# Altium PCB Zotino.PCBDOC (part 6 of 10)
Units mm, origin at the board's own origin, x right, y up, seen from the top; angles counter-clockwise.
Board outline 160.1 x 100.1 mm, 4 copper layers (TopLayer, Internal Plane 2, Signal Layer 1, BottomLayer), stack 1.563 mm thick; 759 components, 378 nets, 2272 pads, 779 vias.
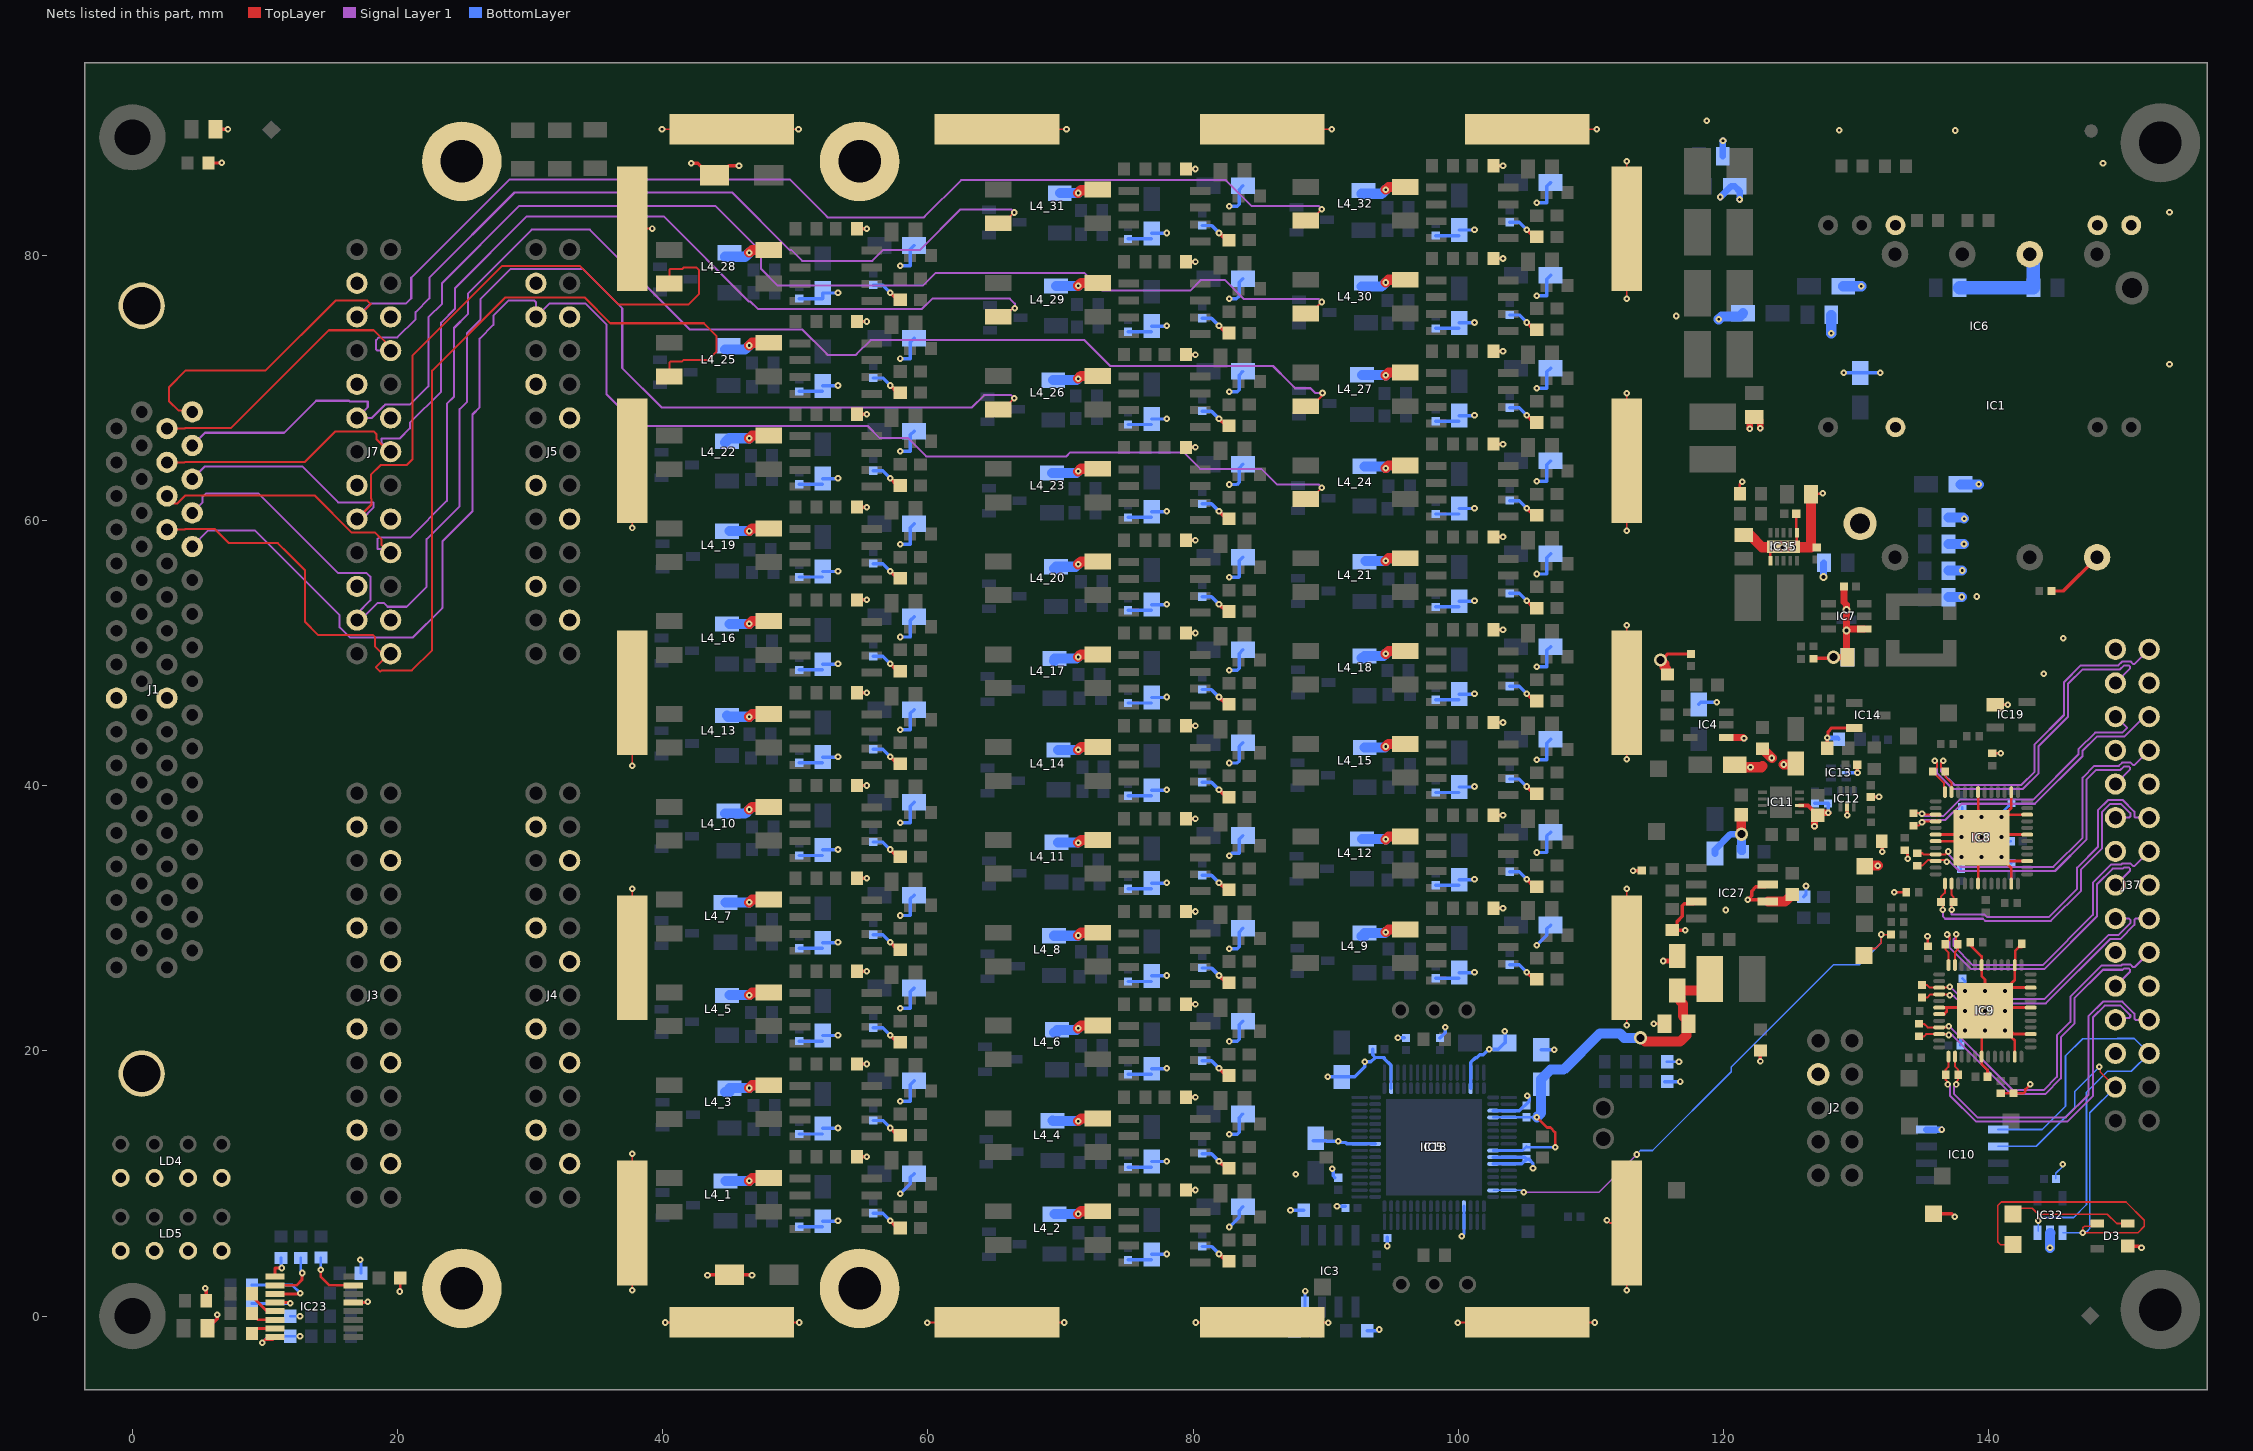
[diagram p6: the nets of this part, all layers, seen from the top]

## Via types
v1: diameter 0.5, hole 0.2, TopLayer to BottomLayer, tented both sides, 659 vias
v2: diameter 0.6, hole 0.3, TopLayer to BottomLayer, tented both sides, 56 vias
v3: diameter 1, hole 0.6, TopLayer to BottomLayer, tented both sides, 26 vias
v4: diameter 0.6, hole 0.3, TopLayer to BottomLayer, 18 vias
v5: diameter 1, hole 0.5, TopLayer to BottomLayer, tented both sides, 9 vias
v6: diameter 0.5, hole 0.2, TopLayer to BottomLayer, tented bottom, 7 vias
v7: diameter 0.5, hole 0.2, TopLayer to BottomLayer, 4 vias

## Nets (pads, with @x,y where several pads share a name; then routed paths per layer and width w, separated by ;. In a path a pad name is that pad's centre, name@x,y a point inside that pad or via, vN(x,y) a via of type N, cw(c..) or ccw(c..) an arc to the next point about the centre after c; other vN are vias at no path point) (continued)
DAC_OUT_P24: J1.26 J5.22 L4_24.4 | length 123
  TopLayer w0.152: L4_24.4@88.49,61.619 88.83,61.619 v1(89.695,62.485)
  Signal Layer 1 w0.152: J1.26@4.514,58.039 5.73,59.255 9.242,59.255 15.628,52.868 15.628,51.953 16.395,51.186 21.162,51.186 23.3,53.325 23.389,53.414 23.389,58.431 25.65,60.692 25.65,67.995 26.183,68.528 26.183,73.723 27.225,74.764 27.225,75.461 28.351,76.586 30.324,76.586 30.436,76.473 J5.22@30.436,75.354 31.44,76.358 34.176,76.358 35.771,74.763 35.771,69.506 38.147,67.129 55.452,67.129 56.34,66.241 58.467,66.241 59.864,64.843 70.449,64.843 70.744,65.139 79.286,65.139 80.522,63.904 85.135,63.904 86.331,62.707 89.473,62.707 v1(89.695,62.485)
DAC_OUT_P25: J1.27 J7.1 L4_25.4 | length 82.2
  TopLayer w0.152: J1.27@2.609,59.309 3.934,59.309 3.972,59.347 6.231,59.347 7.288,58.29 10.969,58.29 11.782,57.477 13.02,56.239 13.02,52.352 13.991,51.381 18.131,51.381 18.309,51.203 18.309,50.492 18.847,49.954 J7.1@19.476,49.954 19.362,49.954 18.359,48.951 18.704,48.606 18.794,48.695 21.082,48.695 22.606,50.219 22.606,71.301 28.14,76.835 34.096,76.835 36.052,74.878 43.097,74.878 44.044,73.931 44.044,72.72 43.415,72.09 42.426,72.09 42.42,72.096 41.547,72.096 41.437,71.987 40.579,71.987 40.49,71.897 L4_25.4@40.49,70.869
DAC_OUT_P26: J1.28 J7.4 L4_26.4 | length 100.7
  TopLayer w0.152: L4_26.4@65.29,68.369 65.63,68.369 v1(66.495,69.235)
  Signal Layer 1 w0.152: J1.28@4.514,60.579 5.305,61.37 5.305,61.795 5.559,62.049 9.496,62.049 15.515,56.03 16.513,56.03 ; 16.521,56.038 17.666,56.038 17.94,55.764 17.94,53.984 16.936,52.981 J7.4@16.936,52.494 17.2,52.494 18.469,53.763 18.988,53.763 19.254,53.498 20.679,53.498 22.196,55.014 22.196,58.602 24.685,61.092 24.685,68.395 25.218,68.928 25.218,74.123 26.26,75.164 26.26,76.718 28.53,78.988 33.959,78.988 36.944,76.003 36.944,71.501 39.918,68.526 63.302,68.526 64.233,69.457 66.273,69.457 v1(66.495,69.235)
DAC_OUT_P27: J1.29 J7.7 L4_27.4 | length 118.3
  TopLayer w0.152: J1.29@2.609,61.849 3.171,61.287 3.372,61.287 3.972,61.887 13.745,61.887 16.521,59.111 18.275,59.111 18.778,58.608 18.778,58.177 19.381,57.574 J7.7@19.476,57.574 ; L4_27.4@88.49,68.619 88.939,68.619 89.757,69.437 v1(89.757,69.619)
  Signal Layer 1 w0.152: J7.7@19.476,57.574 19.192,57.858 18.473,57.858 18.473,58.608 18.581,58.716 20.944,58.716 23.72,61.491 23.72,68.794 24.253,69.328 24.253,74.523 25.294,75.564 25.294,77.118 30.11,81.933 34.499,81.933 41.948,74.484 42.038,74.394 50.536,74.394 52.362,72.568 52.452,72.478 54.545,72.478 54.635,72.568 55.673,73.606 71.806,73.606 73.759,71.653 86.02,71.653 87.24,70.434 87.697,69.977 88.849,69.977 89.207,69.619 v1(89.757,69.619)
DAC_OUT_P28: J1.30 J7.10 L4_28.4 | length 63.7
  TopLayer w0.152: J7.10@16.936,60.114 18.034,61.212 18.034,61.621 17.983,61.672 17.983,63.448 18.726,64.191 20.681,64.191 21.132,64.642 21.132,72.452 27.882,79.202 33.745,79.202 36.671,76.276 41.91,76.276 42.744,77.11 42.744,78.862 42.516,79.09 41.591,79.09 41.488,78.987 40.579,78.987 40.49,78.897 L4_28.4@40.49,77.869
  Signal Layer 1 w0.152: J1.30@4.514,63.119 5.476,64.081 12.798,64.081 15.515,61.364 15.533,61.346 17.478,61.346 17.495,61.364 18.194,61.364 18.194,60.988 17.32,60.114 J7.10@16.936,60.114
DAC_OUT_P29: J1.31 J7.13 L4_29.4 | length 84.1
  TopLayer w0.152: J1.31@2.609,64.389 3.934,64.389 3.972,64.427 13.017,64.427 15.32,66.731 18.199,66.731 18.411,66.519 18.411,66.121 19.338,65.194 J7.13@19.476,65.194 ; L4_29.4@65.29,75.369 65.74,75.369 66.393,76.022 v1(66.548,76.022)
  Signal Layer 1 w0.152: J7.13@19.476,65.194 18.783,65.888 18.783,66.151 18.821,66.19 20.163,66.19 20.926,66.952 20.926,67.365 23.288,69.728 23.288,74.922 24.329,75.964 24.329,77.517 29.745,82.933 40.068,82.933 46.482,76.519 46.608,76.519 47.169,75.958 59.549,75.958 60.324,76.733 66.176,76.733 66.548,76.361 v1(66.548,76.022)
DAC_OUT_P30: J1.32 J7.16 L4_30.4 | length 106.4
  TopLayer w0.152: L4_30.4@88.49,75.619 88.83,75.619 v1(89.695,76.485)
  Signal Layer 1 w0.152: J1.32@4.514,65.659 5.476,66.621 11.451,66.621 13.864,69.034 16.327,69.034 16.395,68.966 17.751,68.966 17.751,68.549 J7.16@16.936,67.734 18.058,67.734 18.926,68.603 19.061,68.738 20.933,68.738 22.323,70.127 22.323,75.322 23.364,76.364 23.364,77.917 29.185,83.738 43.944,83.738 47.423,80.259 47.423,78.968 48.682,77.709 59.596,77.709 60.573,78.686 71.802,78.686 73.146,77.343 79.781,77.343 80.594,78.156 82.373,78.156 83.822,76.707 89.473,76.707 v1(89.695,76.485)
DAC_OUT_P31: J1.33 J7.19 L4_31.4 | length 81.9
  TopLayer w0.152: J1.33@2.609,66.929 3.934,66.929 3.972,66.967 7.429,66.967 14.812,74.351 18.199,74.351 19.476,73.074 J7.19@19.476,72.814 ; L4_31.4@65.29,82.369 65.63,82.369 v1(66.495,83.235)
  Signal Layer 1 w0.152: J7.19@19.476,72.814 18.47,72.814 18.386,72.899 18.386,73.606 18.589,73.81 19.985,73.81 21.357,75.182 21.357,75.722 22.399,76.763 22.399,78.317 28.82,84.738 45.227,84.738 49.551,80.414 49.678,80.414 50.513,79.578 55.807,79.578 56.642,80.414 59.406,80.414 62.449,83.457 66.273,83.457 v1(66.495,83.235)
DAC_OUT_P32: J1.34 J7.22 L4_32.4 | length 105.4
  TopLayer w0.152: J1.34@4.514,68.199 4.426,68.288 3.485,68.288 2.761,69.012 2.761,70.05 4.031,71.32 10.054,71.32 15.32,76.586 17.72,76.586 17.98,76.326 17.009,75.354 J7.22@16.936,75.354 ; L4_32.4@88.49,82.619 88.83,82.619 v1(89.695,83.485)
  Signal Layer 1 w0.152: J7.22@16.936,75.354 17.94,76.358 20.628,76.358 21.031,76.76 21.031,78.314 28.455,85.738 49.561,85.738 52.362,82.936 52.452,82.847 59.68,82.847 59.77,82.936 62.507,85.674 82.468,85.674 84.435,83.707 89.473,83.707 v1(89.695,83.485)
DVCC: C7.1 C8.2 C13.2 C14.1 C83.2 IC5.52 IC5.57 IC18.52 IC18.57 L1.2 | length 33.7
  TopLayer w0.203: v1(105.919,14.988) 106.682,14.226 106.939,14.226 107.302,13.863 v6(107.302,12.738)
  TopLayer w0.762: v3(113.744,20.988) 113.808,20.988 114.087,20.71 116.731,20.71 117.2,21.179 117.2,22.069 117.344,22.213 116.93,22.627 116.93,23.547 116.748,23.729 116.748,24.31 C7.1@116.504,24.554 118.341,24.554 118.96,25.173 L1.2@118.96,25.423
  BottomLayer w0.203: IC18.57@102.626,12.488 IC5.57@103.801,12.488 104.844,12.488 C83.2@105.144,12.788 ; IC18.52@102.626,14.988 IC5.52@103.801,14.988 v1(105.919,14.988) ; C83.2@105.144,12.738 v6(107.302,12.738)
  BottomLayer w0.762: v1(105.919,14.988) 106.244,15.313 C14.1@106.244,17.488 106.244,17.888 106.944,18.588 107.944,18.588 110.681,21.326 112.174,21.326 112.511,20.988 v3(113.744,20.988)
GND: C1.1 C2.1 C3.1 C4.1 C5.1 C7.2 C8.1 C9.1 C10.2 C11.2 C12.2 C13.1 C14.2 C15.2 C17.1 C18.1 C19.1 C20.1 C21.1 C22.1 C23.1 C24.1 C25.1 C26.1 C28.1 C29.1 C30.1 C31.1 C32.1 C33.1 C34.1 C35.1 C36.1 C37.1 C38.1 C47.2 C50.1 C53.1 C61_1.1 C61_2.1 C61_3.1 C61_4.1 C61_5.1 C61_6.1 C61_7.1 C61_8.1 C61_9.1 C61_10.1 C61_11.1 C61_12.1 C61_13.1 C61_14.1 C61_15.1 C61_16.1 C61_17.1 C61_18.1 C61_19.1 C61_20.1 C61_21.1 C61_22.1 C61_23.1 C61_24.1 C61_25.1 C61_26.1 C61_27.1 C61_28.1 C61_29.1 C61_30.1 C61_31.1 C61_32.1 C62_1.1 C62_2.1 C62_3.1 C62_4.1 C62_5.1 C62_6.1 C62_7.1 C62_8.1 C62_9.1 C62_10.1 C62_11.1 C62_12.1 C62_13.1 C62_14.1 C62_15.1 C62_16.1 C62_17.1 C62_18.1 C62_19.1 C62_20.1 C62_21.1 C62_22.1 C62_23.1 C62_24.1 C62_25.1 C62_26.1 C62_27.1 C62_28.1 C62_29.1 C62_30.1 C62_31.1 C62_32.1 C63.1 C68.1 C69.1 C70.1 C71.1 C76.1 C77.1 C78.1 C79.2 C80.1 C81.1 C82.1 C83.1 C90_1.2 C90_2.2 C90_3.2 C90_4.2 C90_5.2 C90_6.2 C90_7.2 C90_8.2 C90_9.2 C90_10.2 C90_11.2 C90_12.2 C90_13.2 C90_14.2 C90_15.2 C90_16.2 C90_17.2 C90_18.2 C90_19.2 C90_20.2 C90_21.2 C90_22.2 C90_23.2 C90_24.2 C90_25.2 C90_26.2 C90_27.2 C90_28.2 C90_29.2 C90_30.2 C90_31.2 C90_32.2 C91_1.1 C91_2.1 C91_3.1 C91_4.1 C91_5.1 C91_6.1 C91_7.1 C91_8.1 C91_9.1 C91_10.1 C91_11.1 C91_12.1 C91_13.1 C91_14.1 C91_15.1 C91_16.1 C91_17.1 C91_18.1 C91_19.1 C91_20.1 C91_21.1 C91_22.1 C91_23.1 C91_24.1 C91_25.1 C91_26.1 C91_27.1 C91_28.1 C91_29.1 C91_30.1 C91_31.1 C91_32.1 C92_1.1 C92_2.1 C92_3.1 C92_4.1 C92_5.1 C92_6.1 C92_7.1 C92_8.1 C92_9.1 C92_10.1 C92_11.1 C92_12.1 C92_13.1 C92_14.1 C92_15.1 C92_16.1 C92_17.1 C92_18.1 C92_19.1 C92_20.1 C92_21.1 C92_22.1 C92_23.1 C92_24.1 C92_25.1 C92_26.1 C92_27.1 C92_28.1 C92_29.1 C92_30.1 C92_31.1 C92_32.1 C93_1.1 C93_2.1 C93_3.1 C93_4.1 C93_5.1 C93_6.1 C93_7.1 C93_8.1 C93_9.1 C93_10.1 C93_11.1 C93_12.1 C93_13.1 C93_14.1 C93_15.1 C93_16.1 C93_17.1 C93_18.1 C93_19.1 C93_20.1 C93_21.1 C93_22.1 C93_23.1 C93_24.1 C93_25.1 C93_26.1 C93_27.1 C93_28.1 C93_29.1 C93_30.1 C93_31.1 C93_32.1 C95.1 C96.1 C124.2 C129.1 C130.1 C131.1 C132.2 C133.1 C134.2 C136.2 C137.1 C138.1 C139.1 C140.1 C141.1 C142.1 C144.1 C147.1 C148.1 C149.1 C150.1 C151.1 CLIP28.1 CLIP29.1 CLIP30.1 CLIP31.1 CLIP32.1 CLIP33.1 CLIP34.1 CLIP37.1 CLIP38.1 CLIP39.1 CLIP40.1 CLIP41.1 CLIP42.1 CLIP43.1 CLIP44.1 CLIP45.1 CLIP46.1 CLIP47.1 D1.2 D2.1 D3.1 IC1.3 IC1.5 IC1.8 IC3.4 IC4.1 IC5.4 IC5.25 IC5.34 IC5.46 IC5.51 IC5.58 IC5.59 IC6.2 IC6.3 IC6.9 IC6.16 IC7.1 IC8.6 IC8.7 IC8.18 IC8.23 IC8.27 IC8.31 IC8.34 IC8.38 IC8.43 IC8.49 IC9.6 IC9.7 IC9.18 IC9.23 IC9.27 IC9.31 IC9.34 IC9.38 IC9.43 IC9.49 IC10.4 IC11.6 IC12.2 IC13.2 IC14.2 IC18.4 IC18.25 IC18.34 IC18.46 IC18.51 IC18.58 IC18.59 IC19.1 IC23.8 IC23.13 IC27.3 IC27.6 IC27.7 IC32.2 IC35.1 IC35.6 IC35.11 J1.17 J1.51 J1.69 J1.70 J2.3 J3.3 J3.6 J3.9 J3.12 J3.15 J3.18 J3.21 J3.24 J4.3 J4.6 J4.9 J4.12 J4.15 J4.18 J4.21 J4.24 J5.3 J5.6 J5.9 J5.12 J5.15 J5.18 J5.21 J5.24 J7.3 J7.6 J7.9 J7.12 J7.15 J7.18 J7.21 J7.24 J37.1 J37.4 J37.7 J37.10 J37.13 J37.16 J37.19 J37.22 J37.25 L4_1.2 L4_2.2 L4_3.2 L4_4.2 L4_5.2 L4_6.2 L4_7.2 L4_8.2 L4_9.2 L4_10.2 L4_11.2 L4_12.2 L4_13.2 L4_14.2 L4_15.2 L4_16.2 L4_17.2 L4_18.2 L4_19.2 L4_20.2 L4_21.2 L4_22.2 L4_23.2 L4_24.2 L4_25.2 L4_26.2 L4_27.2 L4_28.2 L4_29.2 L4_30.2 L4_31.2 L4_32.2 LD4.1 LD4.3 LD4.5 LD4.7 LD5.1 LD5.3 LD5.5 LD5.7 pad.0@54.844,2.088 pad.1 pad.2 pad.3 R2.1 R15.1 R16.1 R17.1 R19.1 R20.1 R21.1 R23.1 R28.1 R29.1 R34.1 R40.1 R44.1 R68_1.1 R68_2.1 R68_3.1 R68_4.1 R68_5.1 R68_6.1 R68_7.1 R68_8.1 R68_9.1 R68_10.1 R68_11.1 R68_12.1 R68_13.1 R68_14.1 R68_15.1 R68_16.1 R68_17.1 R68_18.1 R68_19.1 R68_20.1 R68_21.1 R68_22.1 R68_23.1 R68_24.1 R68_25.1 R68_26.1 R68_27.1 R68_28.1 R68_29.1 R68_30.1 R68_31.1 R68_32.1 R70.1 R153.1 R157.2 R164.1 R171.2 TP6.1 TP7.1 | length 765.9
  TopLayer w0.127: CLIP38.1@37.425,81.738 CLIP38.1@37.707,82.019 v1(39.208,82.019) ; v1(37.694,12.238) 37.707,12.226 CLIP46.1@37.707,7.019 37.707,2.166 v1(37.707,1.942) ; v1(37.694,41.517) 37.694,41.947 37.707,41.96 CLIP40.1@37.707,47.019 ; CLIP47.1@37.707,27.019 v1(37.707,32.226) ; v1(37.707,59.442) 37.707,59.666 CLIP39.1@37.707,64.519 ; v1(39.944,89.519) CLIP41.1@45.206,89.519 v1(50.231,89.519) ; v1(40.194,-0.481) CLIP43.1@45.206,-0.481 50.06,-0.481 v1(50.284,-0.481) ; v1(59.944,-0.512) 59.975,-0.481 CLIP44.1@65.206,-0.481 70.06,-0.481 v1(70.284,-0.481) ; CLIP42.1@65.206,89.519 v1(70.444,89.519) ; v1(80.194,-0.481) CLIP32.1@85.206,-0.481 90.163,-0.481 v1(90.194,-0.512) ; CLIP33.1@85.206,89.519 v1(90.444,89.519) ; v1(99.944,-0.512) 99.975,-0.481 CLIP45.1@105.206,-0.481 110.06,-0.481 v1(110.283,-0.481) ; CLIP34.1@105.206,89.519 v1(110.444,89.519) ; v1(111.207,7.238) 111.425,7.019 CLIP37.1@112.707,7.019 112.707,2.166 v1(112.707,1.942) ; v1(112.694,41.988) 112.707,42.001 CLIP29.1@112.707,47.019 112.707,51.873 v1(112.707,52.096) ; v1(112.694,76.738) 112.707,76.751 CLIP31.1@112.707,82.019 112.707,86.873 v1(112.707,87.096) ; v1(112.707,21.942) 112.707,22.166 CLIP28.1@112.707,27.019 v1(112.707,32.238) ; v1(112.707,59.238) CLIP30.1@112.707,64.519 112.707,69.373 v1(112.707,69.596)
  TopLayer w0.203: v1(9.785,-2.011) 9.785,-1.977 10,-1.762 10.575,-1.762 IC23.8@10.757,-1.581 ; IC23.13@16.657,1.019 17.681,1.019 v1(17.751,1.089) ; v1(20.164,1.851) 20.202,1.889 C96.1@20.202,2.867 ; v1(114.744,22.038) C8.1@115.544,22.038 ; R164.1@121.232,62.019 121.232,62.736 v1(121.419,62.924) ; IC35.6@123.531,56.969 123.531,57.848 IC35.11@123.542,57.858 ; IC35.11@125.447,57.985 125.531,58.07 IC35.1@125.531,59.069 ; C150.1@125.482,60.519 125.482,59.347 IC35.1@125.574,59.255 ; C151.1@126.432,61.668 126.432,62.019 127.449,62.019 v1(127.479,62.049) ; v1(132.888,31.973) R19.1@133.781,31.973 ; R17.1@133.673,35.135 133.693,35.135 133.882,34.946 133.882,34.501 v1(133.888,34.494) ; v1(135.386,28.648) 135.411,28.623 R20.1@135.411,27.899 ; IC8.7@136,35.819 137.781,35.819 138.031,36.069 IC8.49@139.45,36.069 ; IC8.6@136,36.319 IC8.49@137.95,36.319 ; IC9.7@136.264,22.772 136.685,22.772 136.685,22.827 136.83,22.971 136.83,23.272 ; IC9.6@136.264,23.272 136.83,23.272 ; R21.1@138.599,28.191 138.599,28.001 139.464,27.136 IC9.43@139.464,26.472 139.464,25.637 139.714,25.387 v4(139.714,24.522) v4(139.714,23.022) ; IC8.18@139.2,32.619 139.2,34.19 139.45,34.44 v4(139.45,34.641) IC8.49@139.45,36.04 ; IC8.43@139.2,39.519 139.2,38.22 139.45,37.97 v4(139.45,37.641) v4(139.45,36.141) ; IC8.49@139.707,36.069 140.774,36.069 IC8.49@140.898,36.193 ; IC9.49@139.714,23.096 141.964,25.346 IC9.38@141.964,26.472 141.994,26.502 141.994,27.551 142.274,27.832 142.485,27.832 R171.2@142.485,28.09 ; C24.1@139.91,18.043 139.91,18.569 139.464,19.015 IC9.18@139.464,19.572 139.464,21.17 139.714,21.42 v4(139.714,21.522) v4(139.714,23.022) ; R16.1@140.271,42.451 140.912,42.451 v1(140.919,42.443) ; IC19.1@140.494,46.099 140.512,46.117 v1(141.431,46.117) ; IC8.49@140.899,34.591 141.7,33.79 IC8.23@141.7,32.619 ; R23.1@140.906,16.797 R157.2@141.871,16.797 142.61,16.797 142.758,16.945 142.758,17.088 143.133,17.464 v1(143.133,17.498) ; IC8.49@140.913,34.605 IC8.49@139.45,36.069 ; IC8.49@141.024,36.319 IC8.31@142.9,36.319 ; IC9.49@141.189,23.047 141.164,23.022 IC9.49@140.149,23.022 ; IC8.49@141.2,34.319 IC8.27@142.9,34.319 ; IC9.49@141.414,23.272 IC9.31@143.164,23.272 ; IC9.49@141.482,24.79 143.146,24.79 IC9.34@143.164,24.772 ; 141.558,38.177 IC8.49@139.45,36.069 ; IC9.49@141.657,21.079 141.964,20.772 IC9.23@141.964,19.572 ; IC8.38@141.7,39.519 141.7,38.319 141.2,37.819 IC8.34@142.9,37.819 ; IC9.27@143.164,21.272 141.899,21.272 IC9.49@140.149,23.022 ; 136.83,23.272 137.84,23.272 138.09,23.022 v4(138.214,23.022) v4(139.714,23.022) ; v4(139.714,23.022) IC9.49@140.149,23.022
  TopLayer w0.254: v1(5.499,2.088) 5.568,2.019 R29.1@5.568,1.161 ; C15.2@5.668,-0.931 6.396,-0.203 v1(6.396,0.114) ; R28.1@5.744,86.967 6.72,86.967 v1(6.742,86.988) ; C11.2@6.265,89.519 v1(7.205,89.519) ; v6(42.144,86.939) 42.643,86.939 43.539,86.043 D1.2@43.894,86.043 44.272,86.043 44.994,86.764 v6(45.744,86.764) ; v6(43.372,3.087) 43.408,3.123 D2.1@45.043,3.123 46.693,3.123 v6(46.729,3.087) ; R68_1.1@54.648,12.014 v1(55.372,12.014) ; R68_3.1@54.648,19.014 v1(55.372,19.014) ; R68_5.1@54.648,26.014 v1(55.372,26.014) ; R68_7.1@54.648,33.014 v1(55.372,33.014) ; R68_10.1@54.648,40.014 v1(55.372,40.014) ; R68_13.1@54.648,47.014 v1(55.372,47.014) ; R68_16.1@54.648,54.014 v1(55.372,54.014) ; R68_19.1@54.648,61.014 v1(55.372,61.014) ; R68_22.1@54.648,68.014 v1(55.372,68.014) ; R68_25.1@54.648,75.014 v1(55.372,75.014) ; R68_28.1@54.648,82.014 v1(55.372,82.014) ; v1(57.15,7.188) 57.696,6.642 C61_1.1@57.912,6.642 ; v1(57.15,14.188) 57.696,13.642 C61_3.1@57.912,13.642 ; v1(57.15,21.188) 57.696,20.642 C61_5.1@57.912,20.642 ; v1(57.15,28.188) 57.696,27.642 C61_7.1@57.912,27.642 ; v1(57.15,35.188) 57.696,34.642 C61_10.1@57.912,34.642 ; v1(57.15,42.188) 57.696,41.642 C61_13.1@57.912,41.642 ; v1(57.15,49.188) 57.696,48.642 C61_16.1@57.912,48.642 ; v1(57.15,56.188) 57.696,55.642 C61_19.1@57.912,55.642 ; v1(57.15,63.188) 57.696,62.642 C61_22.1@57.912,62.642 ; v1(57.15,70.188) 57.696,69.642 C61_25.1@57.912,69.642 ; v1(57.15,77.188) 57.696,76.642 C61_28.1@57.912,76.642 ; R68_2.1@79.448,9.514 v1(80.172,9.514) ; R68_4.1@79.448,16.514 v1(80.172,16.514) ; R68_6.1@79.448,23.514 v1(80.172,23.514) ; R68_8.1@79.448,30.514 v1(80.172,30.514) ; R68_11.1@79.448,37.514 v1(80.172,37.514) ; R68_14.1@79.448,44.514 v1(80.172,44.514) ; R68_17.1@79.448,51.514 v1(80.172,51.514) ; R68_20.1@79.448,58.514 v1(80.172,58.514) ; R68_23.1@79.448,65.514 v1(80.172,65.514) ; R68_26.1@79.448,72.514 v1(80.172,72.514) ; R68_29.1@79.448,79.514 v1(80.172,79.514) ; R68_31.1@79.448,86.514 v1(80.172,86.514) ; v1(81.95,4.688) 82.496,4.142 C61_2.1@82.712,4.142 ; v1(81.95,11.688) 82.496,11.142 C61_4.1@82.712,11.142 ; v1(81.95,18.688) 82.496,18.142 C61_6.1@82.712,18.142 ; v1(81.95,25.688) 82.496,25.142 C61_8.1@82.712,25.142 ; v1(81.95,32.688) 82.496,32.142 C61_11.1@82.712,32.142 ; v1(81.95,39.688) 82.496,39.142 C61_14.1@82.712,39.142 ; v1(81.95,46.688) 82.496,46.142 C61_17.1@82.712,46.142 ; v1(81.95,53.688) 82.496,53.142 C61_20.1@82.712,53.142 ; v1(81.95,60.688) 82.496,60.142 C61_23.1@82.712,60.142 ; v1(81.95,67.688) 82.496,67.142 C61_26.1@82.712,67.142 ; v1(81.95,74.688) 82.496,74.142 C61_29.1@82.712,74.142 ; v1(81.95,81.688) 82.496,81.142 C61_31.1@82.712,81.142 ; v1@90.417,11.188 v1(90.485,11.12) ; R68_9.1@102.648,30.764 v1(103.372,30.764) ; R68_12.1@102.648,37.764 v1(103.372,37.764) ; R68_15.1@102.648,44.764 v1(103.372,44.764) ; R68_18.1@102.648,51.764 v1(103.372,51.764) ; R68_21.1@102.648,58.764 v1(103.372,58.764) ; R68_24.1@102.648,65.764 v1(103.372,65.764) ; R68_27.1@102.648,72.764 v1(103.372,72.764) ; R68_30.1@102.648,79.764 v1(103.372,79.764) ; R68_32.1@102.648,86.764 v1(103.372,86.764) ; v1(105.15,25.938) 105.696,25.392 C61_9.1@105.912,25.392 ; v1(105.15,32.938) 105.696,32.392 C61_12.1@105.912,32.392 ; v1(105.15,39.938) 105.696,39.392 C61_15.1@105.912,39.392 ; v1(105.15,46.938) 105.696,46.392 C61_18.1@105.912,46.392 ; v1(105.15,53.938) 105.696,53.392 C61_21.1@105.912,53.392 ; v1(105.15,60.938) 105.696,60.392 C61_24.1@105.912,60.392 ; v1(105.15,67.938) 105.696,67.392 C61_27.1@105.912,67.392 ; v1(105.15,74.938) 105.696,74.392 C61_30.1@105.912,74.392 ; v1(105.15,81.938) 105.696,81.392 C61_32.1@105.912,81.392 ; v1(113.178,33.599) C33.1@113.828,33.599 ; v3@115.544,49.688 115.794,49.938 C5.1@117.544,49.938 ; R153.1@116.14,29.105 v1(117.125,29.106) v1(117.125,29.106) ; R153.1@116.49,29.106 116.49,29.746 116.9,30.156 116.9,30.948 117.049,31.097 117.767,31.097 IC27.3@117.94,31.27 ; v1(122.783,19.216) R15.1@122.783,20.016 ; IC27.6@123.221,31.392 v1(121.824,31.392) 122.119,31.687 122.119,32.048 122.438,32.367 123.167,32.367 IC27.7@123.34,32.54 ; R34.1@126.834,49.611 v3@128.204,49.611 ; C32.1@127.816,42.817 127.835,42.836 v1(127.835,43.615) 127.882,43.662 127.882,44.081 128.157,44.356 IC14.2@129.856,44.356 ; v1@129.317,37.779 IC12.2@129.317,38.447 ; C34.1@130.091,41.578 130.097,41.572 130.097,40.993 v1(130.102,40.987) ; C30.1@131.104,39.142 131.115,39.153 131.711,39.153 v1(131.722,39.164) ; R44.1@131.933,35.804 131.977,35.76 v1(131.977,35.033) ; TP6.1@135.837,7.715 137.217,7.715 v1(137.444,7.488) ; R2.1@144.742,54.686 145.632,54.686 IC1.3@148.172,57.226 ; D3.1@150.477,5.279 151.326,5.279 151.452,5.153 v1(151.519,5.153)
  TopLayer w0.3: IC11.6@125.734,38.505 126.362,38.505 C28.1@127.103,37.764
  TopLayer w0.4: v1(115.458,26.781) 116.131,26.781 C7.2@116.504,27.154
  TopLayer w0.5: C29.1@121.332,37.803 C29.1@121.452,37.682 ; v1(121.983,66.925) 121.983,67.533 122.258,67.808 C129.1@122.332,67.808 ; v1(122.78,66.954) C129.1@122.78,67.562 ; R34.1@126.794,49.571 R34.1@126.834,49.611 ; v1(126.863,36.957) 126.863,37.524 127.312,37.973 v1(127.903,37.973) ; v3@128.204,49.611 v3(128.288,49.696) 128.29,49.698 129.359,49.698 C25.1@129.361,49.7 129.27,49.79 v2(129.27,51.722) ; C17.1@129.084,55.017 129.084,53.841 129.27,53.654 v2(129.27,51.722) ; IC7.1@130.62,51.823 129.371,51.823 v2(129.27,51.722)
  TopLayer w0.508: IC4.1@120.194,43.638 121.494,43.638 v1(121.544,43.588)
  TopLayer w0.7: v3@121.358,36.269 v3(121.358,36.35) 121.345,36.363 121.345,37.653 121.375,37.682 C29.1@121.452,37.682
  TopLayer w0.762: v1(46.526,10.206) 46.729,10.409 L4_1.2@47.99,10.409 ; v1(46.526,17.206) 46.729,17.409 L4_3.2@47.99,17.409 ; v1(46.526,24.206) 46.729,24.409 L4_5.2@47.99,24.409 ; v1(46.526,31.206) 46.729,31.409 L4_7.2@47.99,31.409 ; v1(46.526,38.206) 46.729,38.409 L4_10.2@47.99,38.409 ; v1(46.526,45.206) 46.729,45.409 L4_13.2@47.99,45.409 ; v1(46.526,52.206) 46.729,52.409 L4_16.2@47.99,52.409 ; v1(46.526,59.206) 46.729,59.409 L4_19.2@47.99,59.409 ; v1(46.526,66.206) 46.729,66.409 L4_22.2@47.99,66.409 ; v1(46.526,73.206) 46.729,73.409 L4_25.2@47.99,73.409 ; v1(46.526,80.206) 46.729,80.409 L4_28.2@47.99,80.409 ; v1(71.326,7.706) 71.529,7.909 L4_2.2@72.79,7.909 ; v1(71.326,14.706) 71.529,14.909 L4_4.2@72.79,14.909 ; v1(71.326,21.706) 71.529,21.909 L4_6.2@72.79,21.909 ; v1(71.326,28.706) 71.529,28.909 L4_8.2@72.79,28.909 ; v1(71.326,35.706) 71.529,35.909 L4_11.2@72.79,35.909 ; v1(71.326,42.706) 71.529,42.909 L4_14.2@72.79,42.909 ; v1(71.326,49.706) 71.529,49.909 L4_17.2@72.79,49.909 ; v1(71.326,56.706) 71.529,56.909 L4_20.2@72.79,56.909 ; v1(71.326,63.706) 71.529,63.909 L4_23.2@72.79,63.909 ; v1(71.326,70.706) 71.529,70.909 L4_26.2@72.79,70.909 ; v1(71.326,77.706) 71.529,77.909 L4_29.2@72.79,77.909 ; v1(71.326,84.706) 71.529,84.909 L4_31.2@72.79,84.909 ; v1(94.526,28.956) 94.729,29.159 L4_9.2@95.99,29.159 ; v1(94.526,35.956) 94.729,36.159 L4_12.2@95.99,36.159 ; v1(94.526,42.956) 94.729,43.159 L4_15.2@95.99,43.159 ; v1(94.526,49.956) 94.729,50.159 L4_18.2@95.99,50.159 ; v1(94.526,56.956) 94.729,57.159 L4_21.2@95.99,57.159 ; v1(94.526,63.956) 94.729,64.159 L4_24.2@95.99,64.159 ; v1(94.526,70.956) 94.729,71.159 L4_27.2@95.99,71.159 ; v1(94.526,77.956) 94.729,78.159 L4_30.2@95.99,78.159 ; v1(94.526,84.956) 94.729,85.159 L4_32.2@95.99,85.159 ; v3(115.244,49.488) 115.554,49.179 115.554,48.944 115.647,48.85 115.647,48.457 115.716,48.388 R70.1@115.766,48.388 ; C1.1@120.844,41.588 121.036,41.396 122.852,41.396 122.944,41.488 ; C149.1@121.531,58.919 121.973,58.919 122.907,57.985 v2(123.669,57.985) v2(124.431,57.985) v2(125.32,57.985) 125.447,57.985 126.59,57.985 C151.1@126.59,61.414 ; C144.1@122.944,42.788 v1(123.644,42.088) ; IC27.6@123.34,31.27 124.649,31.27 C133.1@125.178,31.799 ; v1@124.544,41.588 125.344,41.588 C3.1@125.444,41.688 ; TP7.1@130.645,33.939 130.684,33.977 v1(131.63,33.977)
  BottomLayer w0.127: C38.1@145.065,10.348 145.065,10.766 145.58,11.281 v1(145.58,11.46)
  BottomLayer w0.203: v1(9.785,-2.011) 10.283,-1.512 C76.1@11.894,-1.512 v1(12.642,-1.512) ; C71.1@11.894,-0.012 v1(12.642,-0.012) ; v1(17.194,4.238) 17.244,4.188 C77.1@17.244,3.238 ; C68.1@115.744,19.191 v1(116.644,19.191) ; C69.1@137.868,20.419 137.868,21.176 v4(138.214,21.522) ; C22.1@137.9,33.721 137.9,34.592 v4(137.95,34.641) ; v4(137.95,37.641) 138.002,37.694 C23.1@138.002,38.384 ; C70.1@138.027,25.455 138.214,25.269 v4(138.214,24.522) ; v4(140.95,34.641) 141.203,34.388 141.475,34.388 C20.1@141.71,34.153 ; v4(140.95,36.141) 141.28,35.811 C19.1@141.667,35.811 ; v4(140.95,37.641) 140.95,37.953 C21.1@141.71,38.714
  BottomLayer w0.254: C91_1.1@50.292,6.738 C90_1.2@52.05,6.738 ; C91_3.1@50.292,13.738 C90_3.2@52.05,13.738 ; C91_5.1@50.292,20.738 C90_5.2@52.05,20.738 ; C91_7.1@50.292,27.738 C90_7.2@52.05,27.738 ; C91_10.1@50.292,34.738 C90_10.2@52.05,34.738 ; C91_13.1@50.292,41.738 C90_13.2@52.05,41.738 ; C91_16.1@50.292,48.738 C90_16.2@52.05,48.738 ; C91_19.1@50.292,55.738 C90_19.2@52.05,55.738 ; C91_22.1@50.292,62.738 C90_22.2@52.05,62.738 ; C91_25.1@50.292,69.738 C90_25.2@52.05,69.738 ; C91_28.1@50.292,76.738 52.05,76.738 52.07,76.758 C90_28.2@52.07,77.158 53.19,77.158 v1(53.22,77.188) ; C90_1.2@52.07,7.158 53.19,7.158 v1(53.22,7.188) ; C90_3.2@52.07,14.158 53.19,14.158 v1(53.22,14.188) ; C90_5.2@52.07,21.158 53.19,21.158 v1(53.22,21.188) ; C90_7.2@52.07,28.158 53.19,28.158 v1(53.22,28.188) ; C90_10.2@52.07,35.158 53.19,35.158 v1(53.22,35.188) ; C90_13.2@52.07,42.158 53.19,42.158 v1(53.22,42.188) ; C90_16.2@52.07,49.158 53.19,49.158 v1(53.22,49.188) ; C90_19.2@52.07,56.158 53.19,56.158 v1(53.22,56.188) ; C90_22.2@52.07,63.158 53.19,63.158 v1(53.22,63.188) ; C90_25.2@52.07,70.158 53.19,70.158 v1(53.22,70.188) ; C92_1.1@55.88,7.754 56.584,7.754 v1(57.15,7.188) ; C92_3.1@55.88,14.754 56.584,14.754 v1(57.15,14.188) ; C92_5.1@55.88,21.754 56.584,21.754 v1(57.15,21.188) ; C92_7.1@55.88,28.754 56.584,28.754 v1(57.15,28.188) ; C92_10.1@55.88,35.754 56.584,35.754 v1(57.15,35.188) ; C92_13.1@55.88,42.754 56.584,42.754 v1(57.15,42.188) ; C92_16.1@55.88,49.754 56.584,49.754 v1(57.15,49.188) ; C92_19.1@55.88,56.754 56.584,56.754 v1(57.15,56.188) ; C92_22.1@55.88,63.754 56.584,63.754 v1(57.15,63.188) ; C92_25.1@55.88,70.754 56.584,70.754 v1(57.15,70.188) ; C92_28.1@55.88,77.754 56.584,77.754 v1(57.15,77.188) ; v1(57.919,9.216) 58.674,9.97 58.674,10.46 C93_1.1@58.958,10.744 ; v1(57.919,16.216) 58.674,16.216 58.674,17.46 C93_3.1@58.958,17.744 ; v1(57.919,23.216) 58.674,23.216 58.674,24.46 C93_5.1@58.958,24.744 ; v1(57.919,30.216) 58.674,30.216 58.674,31.46 C93_7.1@58.958,31.744 ; v1(57.919,37.216) 58.674,37.216 58.674,38.46 C93_10.1@58.958,38.744 ; v1(57.919,44.216) 58.674,44.216 58.674,45.46 C93_13.1@58.958,45.744 ; v1(57.919,51.216) 58.671,51.216 58.674,51.218 58.674,52.46 C93_16.1@58.958,52.744 ; v1(57.919,58.216) 58.674,58.216 58.674,59.46 C93_19.1@58.958,59.744 ; v1(57.919,65.216) 58.674,65.216 58.674,66.46 C93_22.1@58.958,66.744 ; v1(57.919,72.216) 58.674,72.216 58.674,73.46 C93_25.1@58.958,73.744 ; v1(57.919,79.216) 58.674,79.216 58.674,80.46 C93_28.1@58.958,80.744 ; C91_2.1@75.092,4.238 C90_2.2@76.85,4.238 ; C91_4.1@75.092,11.238 C90_4.2@76.85,11.238 ; C91_6.1@75.092,18.238 C90_6.2@76.85,18.238 ; C91_8.1@75.092,25.238 C90_8.2@76.85,25.238 ; C91_11.1@75.092,32.238 C90_11.2@76.85,32.238 ; C91_14.1@75.092,39.238 C90_14.2@76.85,39.238 ; C91_17.1@75.092,46.238 C90_17.2@76.85,46.238 ; C91_20.1@75.092,53.238 C90_20.2@76.85,53.238 ; C91_23.1@75.092,60.238 C90_23.2@76.85,60.238 ; C91_26.1@75.092,67.238 C90_26.2@76.85,67.238 ; C91_29.1@75.092,74.238 C90_29.2@76.85,74.238 ; C91_31.1@75.092,81.238 C90_31.2@76.85,81.238 ; C90_2.2@76.87,4.658 77.99,4.658 v1(78.02,4.688) ; C90_4.2@76.87,11.658 77.99,11.658 v1(78.02,11.688) ; C90_6.2@76.87,18.658 77.99,18.658 v1(78.02,18.688) ; C90_8.2@76.87,25.658 77.99,25.658 v1(78.02,25.688) ; C90_11.2@76.87,32.658 77.99,32.658 v1(78.02,32.688) ; C90_14.2@76.87,39.658 77.99,39.658 v1(78.02,39.688) ; C90_17.2@76.87,46.658 77.99,46.658 v1(78.02,46.688) ; C90_20.2@76.87,53.658 77.99,53.658 v1(78.02,53.688) ; C90_23.2@76.87,60.658 77.99,60.658 v1(78.02,60.688) ; C90_26.2@76.87,67.658 77.99,67.658 v1(78.02,67.688) ; C90_29.2@76.87,74.658 77.99,74.658 v1(78.02,74.688) ; C90_31.2@76.87,81.658 77.99,81.658 v1(78.02,81.688) ; C92_2.1@80.68,5.254 81.384,5.254 v1(81.95,4.688) ; C92_4.1@80.68,12.254 81.384,12.254 v1(81.95,11.688) ; C92_6.1@80.68,19.254 81.384,19.254 v1(81.95,18.688) ; C92_8.1@80.68,26.254 81.384,26.254 v1(81.95,25.688) ; C92_11.1@80.68,33.254 81.384,33.254 v1(81.95,32.688) ; C92_14.1@80.68,40.254 81.384,40.254 v1(81.95,39.688) ; C92_17.1@80.68,47.254 81.384,47.254 v1(81.95,46.688) ; C92_20.1@80.68,54.254 81.384,54.254 v1(81.95,53.688) ; C92_23.1@80.68,61.254 81.384,61.254 v1(81.95,60.688) ; C92_26.1@80.68,68.254 81.384,68.254 v1(81.95,67.688) ; C92_29.1@80.68,75.254 81.384,75.254 v1(81.95,74.688) ; C92_31.1@80.68,82.254 81.384,82.254 v1(81.95,81.688) ; v1(82.719,6.716) 83.474,7.47 83.474,7.96 C93_2.1@83.758,8.244 ; v1(82.719,13.716) 83.327,13.716 83.474,13.862 83.474,14.96 C93_4.1@83.758,15.244 ; v1(82.719,20.716) 83.327,20.716 83.474,20.862 83.474,21.96 C93_6.1@83.758,22.244 ; v1(82.719,27.716) 83.327,27.716 83.474,27.862 83.474,28.96 C93_8.1@83.758,29.244 ; v1(82.719,34.716) 82.908,34.904 83.474,34.904 83.474,35.96 C93_11.1@83.758,36.244 ; v1(82.719,41.716) 83.327,41.716 83.474,41.862 83.474,42.96 C93_14.1@83.758,43.244 ; v1(82.719,48.716) 83.327,48.716 83.474,48.862 83.474,49.96 C93_17.1@83.758,50.244 ; v1(82.719,55.716) 83.427,55.716 83.474,55.762 83.474,56.96 C93_20.1@83.758,57.244 ; v1(82.719,62.716) 83.308,62.716 83.474,62.882 83.474,63.96 C93_23.1@83.758,64.244 ; v1(82.719,69.716) 83.327,69.716 83.474,69.862 83.474,70.96 C93_26.1@83.758,71.244 ; v1(82.719,76.716) 83.268,76.716 83.474,76.922 83.474,77.96 C93_29.1@83.758,78.244 ; v1(82.719,83.716) 83.327,83.716 83.474,83.862 83.474,84.96 C93_31.1@83.758,85.244 ; v1(87.344,7.988) C81.1@88.344,7.988 ; C82.1@87.644,-1.112 88.439,-0.317 IC3.4@88.439,0.688 88.439,1.883 v1(88.444,1.888) ; C79.2@89.052,13.216 90.041,13.216 90.068,13.188 v1(90.944,13.188) 91.04,13.092 91.49,13.092 91.594,12.988 IC5.25@92.551,12.988 IC18.25@93.726,12.988 ; v1(90.143,18.053) 90.158,18.039 C47.2@91.194,18.039 92.178,18.039 92.944,18.805 v1(92.944,19.175) 93.403,19.175 93.729,19.501 ; v1(90.485,11.12) 90.553,11.12 90.553,10.57 C78.1@90.685,10.438 ; v1(90.844,8.288) C53.1@91.494,8.288 ; C80.1@93.144,-1.112 93.944,-1.112 v1(94.044,-1.012) ; C4.1@93.537,20.121 93.537,19.693 93.729,19.501 ; v1(94.644,5.288) C31.1@94.644,5.938 ; IC18.34@94.926,17.188 94.926,18.937 94.891,18.937 94.406,19.422 94.406,19.501 93.729,19.501 ; v1(95.444,20.988) C50.1@95.936,20.988 ; C91_9.1@98.292,25.488 C90_9.2@100.05,25.488 ; C91_12.1@98.292,32.488 C90_12.2@100.05,32.488 ; C91_15.1@98.292,39.488 C90_15.2@100.05,39.488 ; C91_18.1@98.292,46.488 C90_18.2@100.05,46.488 ; C91_21.1@98.292,53.488 C90_21.2@100.05,53.488 ; C91_24.1@98.292,60.488 C90_24.2@100.05,60.488 ; C91_27.1@98.292,67.488 C90_27.2@100.05,67.488 ; C91_30.1@98.292,74.488 C90_30.2@100.05,74.488 ; C91_32.1@98.292,81.488 C90_32.2@100.05,81.488 ; C9.1@98.611,20.969 99.021,21.38 v6(99.021,21.787) ; C90_9.2@100.07,25.908 101.19,25.908 v1(101.22,25.938) ; C90_12.2@100.07,32.908 101.19,32.908 v1(101.22,32.938) ; C90_15.2@100.07,39.908 101.19,39.908 v1(101.22,39.938) ; C90_18.2@100.07,46.908 101.19,46.908 v1(101.22,46.938) ; C90_21.2@100.07,53.908 101.19,53.908 v1(101.22,53.938) ; C90_24.2@100.07,60.908 101.19,60.908 v1(101.22,60.938) ; C90_27.2@100.07,67.908 101.19,67.908 v1(101.22,67.938) ; C90_30.2@100.07,74.908 101.19,74.908 v1(101.22,74.938) ; C90_32.2@100.07,81.908 101.19,81.908 v1(101.22,81.938) ; v6(100.253,6.035) 100.422,6.205 100.422,7.109 IC5.4@100.426,7.113 IC18.4@100.426,8.288 ; IC18.46@100.926,17.188 IC5.46@100.926,18.363 100.926,19.128 101.295,19.496 101.398,19.496 101.621,19.719 101.893,19.719 102.287,20.113 v1(102.318,20.113) 103.003,20.113 C12.2@103.488,20.598 ; IC18.59@102.626,11.488 IC5.59@103.801,11.488 104.794,11.488 C83.1@105.144,11.838 ; IC18.58@102.626,11.988 IC5.58@103.801,11.988 104.994,11.988 C83.1@105.144,11.838 ; IC18.51@102.626,15.488 102.63,15.484 IC5.51@103.797,15.484 ; v1(103.494,21.488) 103.544,21.439 C12.2@103.544,20.598 ; IC5.51@103.801,15.488 104.604,15.488 105.335,16.219 105.335,16.472 v1(105.2,16.608) ; C92_9.1@103.88,26.504 104.584,26.504 v1(105.15,25.938) ; C92_12.1@103.88,33.504 104.584,33.504 v1(105.15,32.938) ; C92_15.1@103.88,40.504 104.584,40.504 v1(105.15,39.938) ; C92_18.1@103.88,47.504 104.584,47.504 v1(105.15,46.938) ; C92_21.1@103.88,54.504 104.584,54.504 v1(105.15,53.938) ; C92_24.1@103.88,61.504 104.584,61.504 v1(105.15,60.938) ; C92_27.1@103.88,68.504 104.584,68.504 v1(105.15,67.938) ; C92_30.1@103.88,75.504 104.584,75.504 v1(105.15,74.938) ; C92_32.1@103.88,82.504 104.584,82.504 v1(105.15,81.938) ; v1(105.628,11.161) 105.628,11.545 105.335,11.838 C83.1@105.144,11.838 ; v1(105.919,27.966) 106.674,28.72 106.674,29.21 C93_9.1@106.958,29.494 ; v1(105.919,34.966) 106.674,34.966 106.674,36.21 C93_12.1@106.958,36.494 ; v1(105.919,41.966) 106.674,41.966 106.674,43.21 C93_15.1@106.958,43.494 ; v1(105.919,48.966) 106.674,48.966 106.674,50.21 C93_18.1@106.958,50.494 ; v1(105.919,55.966) 106.674,55.966 106.674,57.21 C93_21.1@106.958,57.494 ; v1(105.919,62.966) 106.674,62.966 106.674,64.21 C93_24.1@106.958,64.494 ; v1(105.919,69.966) 106.674,69.966 106.674,71.21 C93_27.1@106.958,71.494 ; v1(105.919,76.966) 106.674,76.966 106.674,78.21 C93_30.1@106.958,78.494 ; v1(105.919,83.966) 106.674,83.966 106.674,85.21 C93_32.1@106.958,85.494 ; C14.2@106.244,20.088 v1(107.244,20.088) ; C95.1@115.544,17.688 v1(116.744,17.688) ; C147.1@118.118,46.132 118.287,46.301 v1(119.478,46.301) ; C36.1@126.042,31.631 126.22,31.809 v1(126.22,32.437) ; C37.1@126.894,38.668 C35.1@127.889,38.668 ; C35.1@127.889,38.618 C35.1@127.896,38.61 ; v1(127.903,37.973) v1@127.896,37.98 ; C35.1@127.953,38.553 C35.1@127.896,38.61 ; R40.1@128.588,43.615 R40.1@128.703,43.5 ; v1(129.069,71.137) C10.2@130.319,71.137 v1(131.819,71.137) ; IC13.2@129.255,40.969 129.264,40.978 130.093,40.978 v1(130.102,40.987) ; v1@127.896,37.98 127.886,37.99 v1@127.896,38 ; v1@127.896,37.98 v1@127.896,38 ; v1@127.896,38 C35.1@127.896,38.61
  BottomLayer w0.381: v1(127.835,43.615) R40.1@128.588,43.615
  BottomLayer w0.5: v1(119.744,84.401) 119.759,84.401 120.569,85.21 C2.1@120.844,85.21 121.21,84.844 v1(121.21,84.215) ; C142.1@119.944,87.46 119.944,88.626 v1(119.964,88.646) ; C63.1@121.358,35.112 C63.1@121.452,35.018 ; v2(127.543,55.731) 127.543,56.777 C18.1@127.57,56.804 ; v3(128.288,49.696) 128.292,49.7 C26.1@129.361,49.7 ; IC10.4@135.306,14.068 v1(136.456,14.068)
  BottomLayer w0.508: C124.2@119.356,34.894 119.356,35.169 120.537,36.35 v3(121.358,36.35)
  BottomLayer w0.7: C63.1@121.358,35.112 v3(121.358,36.35)
  BottomLayer w0.762: C62_3.1@44.707,16.894 C62_3.1@45.044,16.894 ; C62_10.1@44.707,37.894 46.214,37.894 v1(46.526,38.206) ; C62_22.1@44.707,65.894 45.018,66.206 v1(46.526,66.206) ; C62_25.1@44.707,72.894 46.214,72.894 v1(46.526,73.206) ; C62_28.1@44.707,79.894 46.214,79.894 v1(46.526,80.206) ; C62_1.1@44.744,10.188 46.508,10.188 v1(46.526,10.206) ; C62_7.1@44.744,31.188 46.508,31.188 v1(46.526,31.206) ; C62_13.1@44.844,45.288 44.926,45.206 v1(46.526,45.206) ; C62_5.1@45.018,24.206 v1(46.526,24.206) ; C62_16.1@45.018,52.206 v1(46.526,52.206) ; C62_19.1@45.018,59.206 v1(46.526,59.206) ; C62_3.1@45.044,17.188 46.508,17.188 v1(46.526,17.206) ; C62_23.1@69.344,63.588 71.208,63.588 v1(71.326,63.706) ; C62_4.1@69.394,14.738 69.426,14.706 v1(71.326,14.706) ; C62_26.1@69.444,70.588 71.208,70.588 v1(71.326,70.706) ; C62_8.1@69.503,28.688 71.308,28.688 v1(71.326,28.706) ; C62_6.1@69.507,21.394 C62_6.1@69.744,21.394 ; C62_17.1@69.507,49.394 C62_17.1@69.544,49.394 ; C62_20.1@69.507,56.394 C62_20.1@69.644,56.394 ; C62_2.1@69.544,7.688 69.562,7.706 v1(71.326,7.706) ; C62_17.1@69.544,49.588 71.208,49.588 v1(71.326,49.706) ; C62_20.1@69.644,56.515 71.134,56.515 v1(71.326,56.706) ; C62_29.1@69.644,77.688 71.308,77.688 v1(71.326,77.706) ; C62_6.1@69.744,21.588 71.208,21.588 v1(71.326,21.706) ; C62_11.1@69.818,35.706 v1(71.326,35.706) ; C62_14.1@69.818,42.706 v1(71.326,42.706) ; C62_31.1@69.944,84.688 71.308,84.688 v1(71.326,84.706) ; C62_9.1@92.707,28.644 C62_9.1@92.935,28.644 ; C62_18.1@92.707,49.644 C62_18.1@92.935,49.644 ; C62_30.1@92.707,77.644 94.214,77.644 v1(94.526,77.956) ; C62_32.1@92.707,84.644 94.214,84.644 v1(94.526,84.956) ; C62_12.1@92.744,35.988 94.493,35.988 v1(94.526,35.956) ; C62_27.1@92.744,70.988 94.493,70.988 v1(94.526,70.956) ; C62_9.1@92.935,28.888 94.458,28.888 v1(94.526,28.956) ; C62_18.1@92.935,49.788 94.358,49.788 v1(94.526,49.956) ; C62_24.1@92.935,64.088 94.393,64.088 v1(94.526,63.956) ; C62_15.1@92.944,42.888 94.458,42.888 v1(94.526,42.956) ; C62_21.1@93.018,56.956 v1(94.526,56.956) ; v1(119.637,75.184) 119.848,75.394 121.236,75.394 C134.2@121.48,75.638 ; v1(128.114,74.114) 128.125,74.125 C131.1@128.125,75.511 ; C132.2@129.033,77.67 v1(130.4,77.67) ; C137.1@136.974,54.229 v1(137.966,54.229) ; C140.1@136.974,56.229 v1(137.998,56.229) ; C139.1@136.974,58.229 v1(138.136,58.229) ; C138.1@136.974,60.229 138.062,60.229 v1(138.147,60.144) ; C136.2@137.874,62.729 v1(139.245,62.729) ; v1(144.624,5.153) 144.624,6.237 IC32.2@144.641,6.254
  BottomLayer w1.016: C130.1@137.806,77.546 C141.1@143.372,77.546 143.372,79.806 IC1.5@143.092,80.086
  other v1: 87.744,10.688 120.173,30.63 129.318,37.779 122.038,41.396 124.549,41.603 144.149,48.436 145.632,51.13 139.09,54.27 153.636,71.797 116.43,75.425 153.636,83.253 148.619,86.941 137.482,89.416 128.733,89.435 118.744,90.15
  other v2: 129.259,53.244
  other v4: 141.214,21.522 141.214,23.022 141.214,24.522 137.95,36.141
I2C_SCL: D3.3 IC10.6 IC32.1 J37.27 TP12.1 | length 49.2
  TopLayer w0.127: TP12.1@141.844,5.388 140.885,5.388 140.671,5.602 140.671,8.346 140.935,8.611 150.351,8.611 151.726,7.235 151.726,6.768 151.253,6.295 v1(147.083,6.295) 147.095,6.307 147.095,6.651 147.22,6.776 147.973,6.776 D3.3@148.177,6.979 ; v1(148.345,18.815) 148.416,18.743 148.416,18.414 J37.27@149.561,17.269
  BottomLayer w0.127: IC10.6@140.706,12.798 143.586,12.798 146.499,15.711 146.499,16.939 148.357,18.797 148.345,18.81 v1(148.345,18.815) ; IC32.1@145.578,6.295 v1(147.083,6.295) 147.149,6.36 147.386,6.36 147.631,6.604 147.631,15.339 J37.27@149.561,17.269
I2C_SDA: D3.2 IC10.5 IC32.3 J37.26 TP11.1 | length 46
  TopLayer w0.127: TP11.1@141.844,7.688 142.415,8.133 143.29,8.133 143.735,7.688 ; v1(143.735,7.185) 143.735,7.688 ; D3.2@150.477,6.979 149.653,6.979 148.944,7.688 143.735,7.688
  BottomLayer w0.127: IC10.5@140.706,14.068 144.025,14.068 145.796,15.839 145.796,19.642 147.083,20.929 149.685,20.929 149.688,20.932 150.978,20.932 J37.26@152.101,19.809 150.752,18.46 148.961,18.46 147.377,16.876 147.377,8.414 146.402,7.439 143.989,7.439 v1(143.735,7.185) IC32.3@143.735,6.423
LDACn: IC5.63 IC18.63 R101.1 TP17.1 | length 41.1
  TopLayer w0.127: TP17.1@130.594,27.188 131.135,27.73 131.485,27.73 131.906,28.15 v1(131.906,28.775) 131.931,28.75 R101.1@132.655,28.75
  Signal Layer 1 w0.127: v1(104.944,9.349) 110.605,9.349 v1(113.444,12.188)
  BottomLayer w0.127: IC18.63@102.626,9.488 IC5.63@103.801,9.488 104.805,9.488 v1(104.944,9.349) ; v1(113.444,12.188) 113.744,12.488 114.644,12.488 120.591,18.435 120.591,18.791 128.288,26.488 130.244,26.488 131.906,28.15 v1(131.906,28.775)
LED0: IC23.15 R113.1 | length 4.1
  TopLayer w0.203: v1(14.195,3.502) 14.195,2.994 14.869,2.319 IC23.15@16.657,2.319
  BottomLayer w0.203: v1(14.195,3.502) 14.207,3.514 R113.1@14.207,4.394
LED1: IC23.1 R114.1 | length 2
  TopLayer w0.203: IC23.1@10.757,2.969 10.757,3.62 10.766,3.629 v1(11.274,3.629)
  BottomLayer w0.203: R114.1@11.207,4.394 11.207,3.696 v1(11.274,3.629)
LED2: IC23.2 R115.1 | length 3.9
  TopLayer w0.203: IC23.2@10.757,2.319 12.377,2.319 12.798,2.74 v1(12.798,3.248)
  BottomLayer w0.203: R115.1@12.707,4.394 12.707,3.339 v1(12.798,3.248)
LED3: IC23.3 R119.1 | length 5.9
  TopLayer w0.203: IC23.3@10.757,1.669 12.616,1.669 v1(12.671,1.724)
  BottomLayer w0.203: R119.1@9.007,2.344 12.05,2.344 v1(12.671,1.724)
LED4: IC23.4 R120.1 | length 4.1
  TopLayer w0.203: IC23.4@10.757,1.019 11.852,1.019 v1(11.909,0.962)
  BottomLayer w0.203: R120.1@9.007,0.944 11.891,0.944 v1(11.909,0.962)
LED5: IC23.5 R121.1 | length 2.4
  TopLayer w0.203: R121.1@9.007,1.694 9.007,1.496 10.133,0.369 IC23.5@10.757,0.369
LED6: IC23.6 R122.1 | length 1.9
  TopLayer w0.203: R122.1@9.007,0.194 9.482,-0.281 IC23.6@10.757,-0.281
LED7: IC23.7 R123.1 | length 1.9
  TopLayer w0.203: R123.1@9.007,-1.306 9.381,-0.931 IC23.7@10.757,-0.931
LVDS0_N: IC8.48 J37.3 R141.2 | length 27.2
  TopLayer w0.152: v1(135.931,41.891) 136.105,41.718 136.105,41.384 R141.2@135.787,41.067 136.624,40.23 136.624,39.595 IC8.48@136.7,39.519
  Signal Layer 1 w0.152: v1(135.931,41.891) 136.105,41.718 136.105,40.94 137.293,39.752 142.579,39.752 143.767,40.94 143.767,42.996 145.981,45.21 145.981,47.678 147.081,48.778 149.899,48.778 150.186,49.064 150.571,49.064 150.66,48.975 150.66,48.848 J37.3@149.561,47.749
LVDS0_P: IC8.47 J37.2 R141.1 | length 26.8
  TopLayer w0.152: v1(136.584,41.891) 136.41,41.718 136.41,41.384 R141.1@136.727,41.067 136.727,40.68 137.2,40.208 IC8.47@137.2,39.519
  Signal Layer 1 w0.152: v1(136.584,41.891) 136.41,41.718 136.41,41.067 137.419,40.057 142.453,40.057 143.462,41.067 143.462,43.122 145.676,45.336 145.676,47.804 146.955,49.083 149.773,49.083 150.059,49.369 150.697,49.369 150.876,49.19 151.002,49.19 J37.2@152.101,50.289
LVDS1_N: IC8.4 J37.6 R144.2 | length 22.6
  TopLayer w0.152: R144.2@134.327,36.99 134.713,36.99 v1@134.969,37.246 ; v1(134.972,37.242) 135.048,37.319 IC8.4@136,37.319 IC8.4@136.097,37.416
  Signal Layer 1 w0.152: v1(134.972,37.242) 135.146,37.416 136.728,37.416 137.954,38.641 143.482,38.641 147.072,42.231 147.072,42.623 148.152,43.704 150.212,43.704 151.717,45.209 J37.6@152.101,45.209
LVDS1_P: IC8.3 J37.5 R144.1 | length 21.3
  TopLayer w0.152: R144.1@134.327,37.93 134.713,37.93 ; v1(134.972,37.895) 135.048,37.819 IC8.3@136,37.819 IC8.3@136.097,37.721
  Signal Layer 1 w0.152: v1(134.972,37.895) 135.146,37.721 136.602,37.721 137.827,38.946 143.355,38.946 146.767,42.358 146.767,42.75 148.026,44.009 150.085,44.009 150.444,44.367 149.602,45.209 J37.5@149.561,45.209
LVDS2_N: IC8.10 J37.9 R147.2 | length 24.1
  TopLayer w0.152: R147.2@134.606,33.967 134.993,33.967 135.417,34.391 v1@136.827,34.391
  Signal Layer 1 w0.152: v1(136.827,34.268) 137.073,34.268 137.77,33.572 144.998,33.572 147.386,35.96 147.386,40.485 148.1,41.2 149.941,41.2 150.186,41.444 150.571,41.444 150.66,41.355 150.66,41.228 J37.9@149.561,40.129
LVDS2_P: IC8.9 J37.8 R147.1 | length 24.6
  TopLayer w0.152: R147.1@134.606,34.907 134.993,34.907 135.081,34.819 IC8.9@136,34.819 136.725,34.819 v1(136.95,35.044)
  Signal Layer 1 w0.152: v1@136.871,34.901 137.025,34.747 137.305,34.467 137.896,33.876 144.871,33.876 147.081,36.086 147.081,40.184 147.081,40.612 147.974,41.504 149.815,41.504 150.059,41.749 150.697,41.749 150.876,41.57 151.002,41.57 J37.8@152.101,42.669
LVDS3_N: IC8.14 J37.12 R151.2 | length 24.4
  TopLayer w0.152: v1(137.2,30.641) 137.2,31.086 137.193,31.093 R151.2@137.337,31.237 137.337,31.623 137.2,31.76 IC8.14@137.2,32.619
  Signal Layer 1 w0.152: v1(137.2,30.641) 137.2,30.272 139.69,30.272 139.854,30.109 144.557,30.109 146.665,32.217 146.665,33.817 148.228,35.379 148.228,38.142 149.009,38.923 150.113,38.923 150.984,38.053 150.984,37.679 151.073,37.589 J37.12@152.101,37.589
LVDS3_P: IC8.13 J37.11 R151.1 | length 24.8
  TopLayer w0.152: v1(136.541,30.641) 136.541,31.093 R151.1@136.397,31.237 136.397,31.623 136.7,31.926 IC8.13@136.7,32.619
  Signal Layer 1 w0.152: v1(136.541,30.641) 136.541,30.141 136.715,29.968 139.564,29.968 139.728,29.804 144.683,29.804 146.97,32.091 146.97,33.69 148.532,35.253 148.532,38.015 149.135,38.618 149.987,38.618 150.679,37.926 150.679,37.679 150.589,37.589 J37.11@149.561,37.589
LVDS4_N: IC9.48 J37.15 R160.2 | length 24.2
  TopLayer w0.152: IC9.48@136.964,26.472 136.964,27.43 136.729,27.665 R160.2@136.729,28.051 137.047,28.369 v1@137.047,28.775
  Signal Layer 1 w0.152: v1(136.859,28.775) 136.859,28.676 137.047,28.488 137.047,27.795 138.67,26.172 140.017,26.172 140.022,26.167 144.189,26.167 148.164,30.142 148.164,32.567 149.338,33.741 150.103,33.741 150.186,33.824 150.571,33.824 150.66,33.735 150.66,33.608 J37.15@149.561,32.509
LVDS4_P: IC9.47 J37.14 R160.1 | length 23.9
  TopLayer w0.152: IC9.47@137.464,26.472 137.464,27.459 137.669,27.665 R160.1@137.669,28.051 137.544,28.176 v1(137.544,28.788)
  Signal Layer 1 w0.152: v1(137.544,28.788) 137.544,28.622 137.352,28.43 137.352,27.921 138.796,26.477 140.144,26.477 140.149,26.472 144.063,26.472 147.859,30.268 147.859,32.693 149.212,34.046 149.977,34.046 150.059,34.129 150.697,34.129 150.876,33.95 151.002,33.95 J37.14@152.101,35.049
LVDS5_N: IC9.4 J37.18 R163.2 | length 20.4
  TopLayer w0.152: R163.2@134.964,24.025 135.35,24.025 135.597,24.272 IC9.4@136.264,24.272 136.986,24.272 v1(137.062,24.196)
  Signal Layer 1 w0.152: v1(137.062,24.196) 137.122,24.136 137.375,24.136 137.917,23.594 144.307,23.594 149.146,28.433 149.91,28.433 150.984,29.506 150.984,29.88 151.073,29.969 J37.18@152.101,29.969
LVDS5_P: IC9.3 J37.17 R163.1 | length 20
  TopLayer w0.152: R163.1@134.964,24.965 135.35,24.965 135.544,24.772 IC9.3@136.264,24.772 136.986,24.772 v1(137.062,24.848)
  Signal Layer 1 w0.152: v1(137.062,24.848) 137.094,24.848 138.043,23.899 144.181,23.899 149.019,28.737 149.784,28.737 150.679,29.632 150.679,29.88 150.589,29.969 J37.17@149.561,29.969
LVDS6_N: IC9.10 J37.21 R166.2 | length 26.5
  TopLayer w0.152: R166.2@134.736,21.104 135.122,21.104 135.29,21.272 IC9.10@136.264,21.272 136.91,21.272 v1(136.986,21.196)
  Signal Layer 1 w0.152: v1(136.986,21.196) 137.251,21.196 141.706,16.74 144.263,16.74 145.447,17.924 145.447,21.045 146.462,22.06 146.462,23.966 148.617,26.121 150.103,26.121 150.186,26.204 150.571,26.204 150.66,26.115 150.66,25.988 J37.21@149.561,24.889
LVDS6_P: IC9.9 J37.20 R166.1 | length 26.9
  TopLayer w0.152: R166.1@134.736,22.044 135.122,22.044 135.394,21.772 IC9.9@136.264,21.772 136.91,21.772 v1(136.986,21.848)
  Signal Layer 1 w0.152: v1(136.986,21.848) 137.029,21.848 141.833,17.045 144.137,17.045 145.143,18.05 145.143,21.172 146.157,22.186 146.157,24.092 148.491,26.426 149.977,26.426 150.059,26.509 150.697,26.509 150.876,26.33 151.002,26.33 J37.20@152.101,27.429
LVDS7_N: IC9.14 J37.24 R170.2 | length 26.4
  TopLayer w0.152: IC9.14@137.464,19.572 137.464,18.813 137.695,18.582 R170.2@137.695,18.196 137.695,17.81 137.551,17.666 v1(137.551,17.472)
  Signal Layer 1 w0.152: v1(137.551,17.472) 137.377,17.299 137.377,16.761 139.15,14.988 145.819,14.988 147.543,16.712 147.543,22.648 148.619,23.724 150.073,23.724 150.979,22.817 150.979,22.443 151.073,22.349 J37.24@152.101,22.349
LVDS7_P: IC9.13 J37.23 R170.1 | length 26.3
  TopLayer w0.152: v1(136.899,17.472) 136.899,17.666 136.755,17.81 R170.1@136.755,18.196 136.755,18.582 136.964,18.791 IC9.13@136.964,19.572
  Signal Layer 1 w0.152: v1(136.899,17.472) 137.072,17.299 137.072,16.635 139.024,14.683 145.945,14.683 147.847,16.585 147.847,22.521 148.745,23.419 149.946,23.419 150.674,22.691 150.674,22.554 150.585,22.465 149.677,22.465 J37.23@149.561,22.349